# Altium PCB PCB1.PcbDoc (part 3 of 3)
Units mil, origin at the board's own origin, x right, y up, seen from the top; angles counter-clockwise.
Board outline 7110 x 5135 mil, 4 copper layers (Top Layer, Layer 1, Layer 2, Bottom Layer), stack 23.756 mil thick; 224 components, 137 nets, 658 pads, 306 vias.
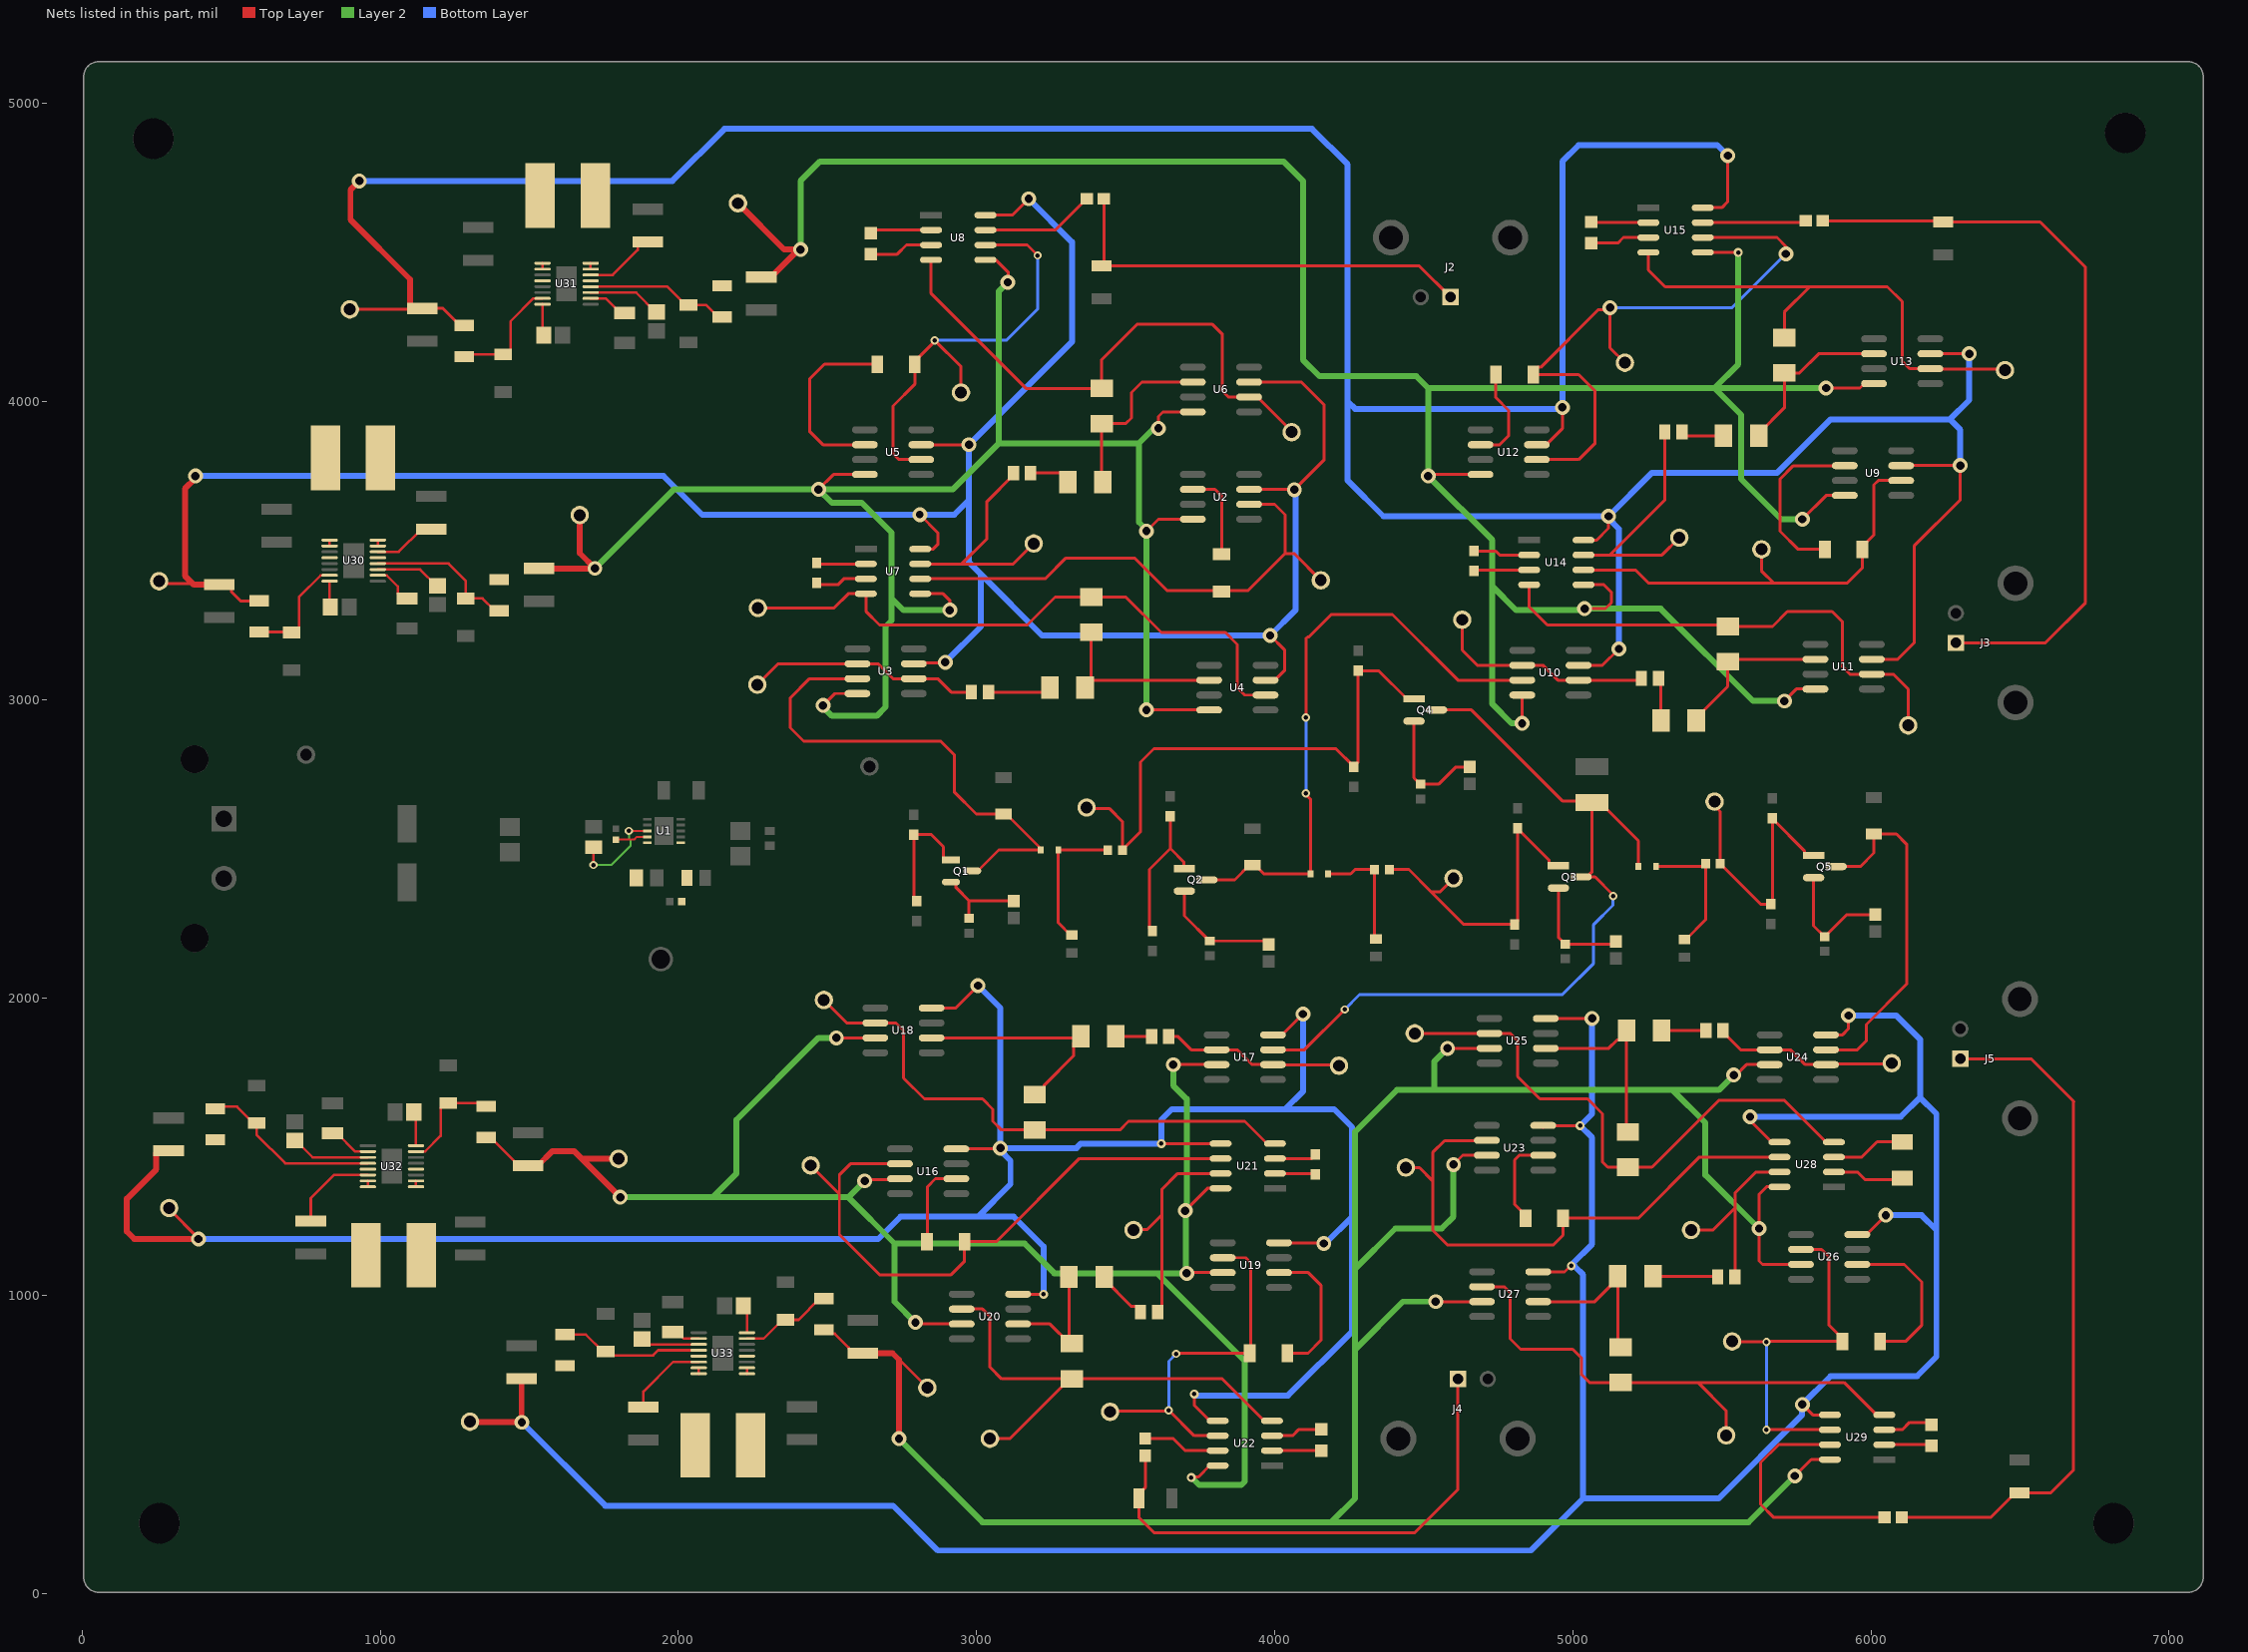
[diagram p4: the nets of this part, all layers, seen from the top]

## Via types
v1: diameter 28, hole 15, Top Layer to Bottom Layer, 195 vias
v2: diameter 50, hole 28, Top Layer to Bottom Layer, 70 vias
v3: diameter 19.68, hole 7.87, Top Layer to Bottom Layer, 24 vias
v4: diameter 30, hole 15, Top Layer to Bottom Layer, 16 vias
v5: diameter 50, hole 25, Top Layer to Bottom Layer, 1 vias

## Nets (pads, with @x,y where several pads share a name; then routed paths per layer and width w, separated by ;. In a path a pad name is that pad's centre, name@x,y a point inside that pad or via, vN(x,y) a via of type N, cw(c..) or ccw(c..) an arc to the next point about the centre after c; other vN are vias at no path point) (continued)
NetC5_1: C5.1 R16.2 R19.2 | length 456.8
  Top Layer w10: R16.2@5279.53,2440 5435.39,2440 C5.1@5445.32,2449.92 ; R19.2@5375,2194.53 5378.94,2194.53 5445.32,2260.91 C5.1@5445.32,2449.92 ; C5.1@5445.32,2450 C5.1@5445.32,2449.92
NetC5_2: C5.2 J8.1 Q5.1 R14.1 R26.2 | length 926.4
  Top Layer w10: J8.1@5475.55,2657.4 5475.55,2643.38 5494.68,2624.25 C5.2@5494.68,2450 5494.68,2448.94 5630.16,2313.46 R26.2@5665,2313.46 5670,2318.46 R14.1@5670,2599.57 ; R14.1@5670,2601.54 R14.1@5670,2599.57 ; Q5.1@5807.69,2477.09 5783.94,2477.09 5776.78,2484.25 5776.78,2492.79 R14.1@5670,2599.57
NetC6_1: C6.1 R17.2 R20.2 | length 472.4
  Top Layer w10: R20.2@3320,2209.53 3316.06,2209.53 3274.53,2251.06 R17.2@3274.53,2495 C6.1@3440.32,2495
NetC6_2: C6.2 J9.1 Q4.1 R13.1 R25.2 | length 1868.1
  Top Layer w10: J9.1@3369.25,2637.72 3371.97,2635 3445,2635 3489.68,2590.32 C6.2@3489.68,2496.06 ; C6.2@3489.68,2495 C6.2@3489.68,2496.06 ; R25.2@4265,2773.46 R25.2@4265,2775.43 ; Q4.1@4467.2,3002.4 4443.45,3002.4 4349.32,3096.54 R13.1@4280,3096.54 4280,2790.43 R25.2@4265,2775.43 ; C6.2@3489.68,2496.06 3550,2556.38 3550,2790 3595,2835 4205.43,2835 R25.2@4265,2775.43
NetC7_1: C7.1 R18.2 R21.2 | length 397.4
  Top Layer w10: R18.2@4179.53,2415 4255,2415 4270,2430 C7.1@4335.32,2430 4335.32,2201.22 R21.2@4340,2196.54
NetC7_2: C7.2 J10.1 Q3.1 R11.1 R24.2 | length 1112.5
  Top Layer w10: C7.2@4384.68,2430 4450,2430 4525,2355 ; J10.1@4600,2400 4555,2355 4525,2355 ; R11.1@4815,2568.54 R11.1@4815,2566.57 ; Q3.1@4952.2,2442.4 4928.45,2442.4 4921.29,2449.57 4921.29,2460.29 R11.1@4815,2566.57 ; 4525,2355 4634.53,2245.47 R24.2@4805,2245.47 4815,2255.47 R11.1@4815,2566.57
NetC8_1: C8.1 Q1.2 R27.2 | length 304.2
  Top Layer w10: Q1.2@2914.17,2387.6 2925.36,2387.6 2931.25,2381.71 2931.25,2368.75 2975,2325 ; C8.1@2975,2265.74 2975,2325 ; R27.2@3125,2323.57 3123.57,2325 2975,2325
NetC9_1: C9.1 Q2.2 R28.2 | length 405.7
  Top Layer w10: Q2.2@3697.2,2357.6 3697.2,2274.34 3781.58,2189.96 C9.1@3782.64,2189.96 3968.61,2189.96 R28.2@3980,2178.57
NetC10_1: C10.1 Q3.2 R29.2 | length 371.7
  Top Layer w10: Q3.2@4952.2,2367.6 4952.2,2201.42 4973.94,2179.68 C10.1@4975,2179.68 5136.12,2179.68 R29.2@5145,2188.57
NetC11_1: C11.1 Q4.2 R30.2 | length 410.5
  Top Layer w10: Q4.2@4467.2,2927.6 4467.2,2737.48 4488.94,2715.74 C11.1@4490,2715.74 4549.56,2715.74 4606.43,2772.61 R30.2@4655,2772.61
NetC12_1: C12.1 Q5.2 R31.2 | length 414.3
  Top Layer w10: Q5.2@5807.69,2402.28 5807.69,2240.93 5843.94,2204.68 C12.1@5845,2204.68 5846.06,2204.68 5919.95,2278.57 R31.2@6015,2278.57
NetC13_1: C13.1 J12.1 U3.2 U3.6 | length 786.1
  Top Layer w10: J12.1@2265,3050 2335,3120 U3.2@2600.51,3120 2670,3120 2720,3070 U3.6@2789.49,3070 2870,3070 2915,3025 C13.1@2982.74,3025
NetC13_2: C13.2 R33.1 | length 212.2
  Top Layer w10: C13.2@3040,3025 3230.94,3025 R33.1@3245.94,3040
NetC14_1: C14.1 J14.1 U7.7 | length 786.2
  Top Layer w10: U7.7@2811.18,3455 2950,3455 ; C14.1@3124.09,3759.76 3124.09,3753.77 3035,3664.69 3035,3540 2950,3455 ; J14.1@3192.09,3523.54 3123.54,3455 2950,3455
NetC14_2: C14.2 R36.1 | length 140
  Top Layer w10: C14.2@3181.35,3759.76 3281.42,3759.76 3305.94,3735.24 R36.1@3305.94,3730
NetC15_1: C15.1 J2.1 R37.2 | length 1441.4
  Top Layer w10: R37.2@3427.14,4680 3427.14,4462.26 C15.1@3420,4455.12 4484.88,4455.12 J2.1@4590,4350
NetC16_1: C16.1 J18.1 U10.2 U10.6 | length 747.2
  Top Layer w10: J18.1@4629.1,3267.64 4629.1,3165.91 4679.68,3115.32 4830.19,3115.32 U10.2@4830.51,3115 4900,3115 4950,3065 U10.6@5019.49,3065 5224.6,3065 C16.1@5230.39,3070.79
NetC16_2: C16.2 R42.1 | length 144.2
  Top Layer w10: C16.2@5287.65,3070.79 5295.94,3062.49 R42.1@5295.94,2930
NetC17_1: C17.1 J20.1 U14.7 | length 834.2
  Top Layer w10: U14.7@5036.18,3485 5125,3485 ; C17.1@5309.13,3897.56 5309.13,3669.13 5125,3485 ; J20.1@5357.44,3543.23 5299.21,3485 5125,3485
NetC17_2: C17.2 R45.1 | length 144.8
  Top Layer w10: C17.2@5366.39,3897.56 5378.94,3885 R45.1@5505.94,3885
NetC18_1: C18.1 J3.1 R46.2 | length 2561.9
  Top Layer w10: R46.2@5838.77,4606.22 6239.33,4606.22 C18.1@6243.27,4602.28 6567.72,4602.28 6720,4450 6720,3325 6585,3190 J3.1@6285,3190
NetC19_1: C19.1 J24.1 U17.2 U17.6 | length 611.6
  Top Layer w10: C19.1@3644.84,1870 3675,1870 3720,1825 U17.6@3805.51,1825 3875,1825 3925,1775 U17.2@3994.49,1775 3996.2,1773.29 4214,1773.29 J24.1@4215.71,1771.57
NetC19_2: C19.2 R51.1 | length 119.9
  Top Layer w10: R51.1@3467.68,1870 C19.2@3587.58,1870
NetC20_1: C20.1 J26.1 U21.7 | length 751.8
  Top Layer w10: J26.1@3526.73,1220.39 3527.86,1221.53 3572.64,1221.53 3621.11,1270 ; C20.1@3607.26,945 3621.11,958.85 3621.11,1270 ; U21.7@3818.82,1410 3675,1410 3621.11,1356.11 3621.11,1270
NetC20_2: C20.2 R54.1 | length 178.7
  Top Layer w10: R54.1@3428.31,1062.91 3428.31,1055.04 3518.5,964.85 3536.15,964.85 3550,950.99 C20.2@3550,945
NetC21_1: C21.1 J4.1 R55.2 | length 1738.6
  Top Layer w10: R55.2@3566.1,463.48 3566.1,356.1 3544.76,334.76 C21.1@3544.76,320 3544.76,255.24 3595,205 4470,205 4615,350 J4.1@4615,720.39
NetC22_1: C22.1 J30.1 U24.2 U24.6 | length 618.9
  Top Layer w10: C22.1@5504.18,1889.68 5504.18,1883.69 5562.87,1825 U24.6@5660.51,1825 5730,1825 5780,1775 U24.2@5849.49,1775 5851.99,1777.5 6067.5,1777.5 J30.1@6070,1780
NetC22_2: C22.2 R60.1 | length 148.5
  Top Layer w10: R60.1@5298.39,1889.68 C22.2@5446.92,1889.68
NetC23_1: C23.1 J32.1 U28.7 | length 639.6
  Top Layer w10: J32.1@5396.81,1220.39 5470.39,1220.39 5545,1295 ; C23.1@5543.55,1062.91 5545,1064.36 5545,1295 ; U28.7@5693.82,1415 5615,1415 5545,1345 5545,1295
NetC23_2: C23.2 R62.1 | length 218.1
  Top Layer w10: R62.1@5269.06,1065 5484.2,1065 C23.2@5486.29,1062.91
NetC24_1: C24.1 J5.1 R64.2 | length 2319.2
  Top Layer w10: R64.2@6103.55,255.83 6401.73,255.83 6484.41,338.5 C24.1@6499.17,338.5 6603.5,338.5 6680,415 6680,1650 6680.86,1650.86 6536.72,1795 J5.1@6300,1795
NetC25_1: C25.1 U30.6 | length 210.9
  Top Layer w8.5: U30.6@991.71,3495.53 1062.17,3495.53 1138.52,3571.88 C25.1@1171,3571.88
NetC27_1: C27.1 J35.1 R68.2 U2.7 U3.7 U4.7 U5.7 U6.7 U7.8 U8.8 U30.12 | length 8421.8
  Top Layer w10: J35.1@258,3397 265.56,3389.44 359.44,3389.44 ; C27.1@501.18,3376.42 501.18,3361.38 531.36,3331.21 R68.2@594,3331.21 ; U3.7@2789.49,3120 2791.99,3122.5 2892.5,3122.5 v2(2895,3125) ; v5(2810,3620) 2870,3560 2870,3520 2855,3505 U7.8@2811.18,3505 ; U5.7@2814.49,3855 v2(2975,3855) ; U8.8@3030,4625 3120,4625 v2(3175,4680) ; U6.7@3914.49,4065 4090,4065 4165,3990 4165,3802.97 v2(4066.32,3704.29) ; U2.7@3914.85,3704.64 v2@4065.96,3704.64 ; U4.7@3969.49,3065 4000.98,3065 4032.8,3096.81 4032.8,3167.2 v2(3985,3215)
  Top Layer w20: v2(380,3750) 380,3742.22 345,3707.22 345,3415 374.88,3385.12 492.48,3385.12 C27.1@501.18,3376.42 ; U2.7@3914.49,3705 U2.7@3914.85,3704.64 ; v2@4065.96,3704.64 v2(4066.32,3704.29)
  Bottom Layer w20: v2(380,3750) 1950,3750 2080,3620 v5(2810,3620) 2925,3620 2975,3670 ; v2(2895,3125) 3015,3245 3015,3420 ; v2(3175,4680) 3320,4535 3320,4200 v2(2975,3855) 2975,3670 ; v2(4066.32,3704.29) 4070,3700.6 4070,3300 v2(3985,3215) 3220,3215 3015,3420 ; 2975,3670 2975,3460 3015,3420
NetC28_1: C28.1 J36.1 R69.2 U2.4 U3.4 U4.4 U5.4 U6.4 U7.5 U8.5 U30.5 | length 6401.2
  Top Layer w10: v2(2470,3705) 2520,3755 U5.4@2625.51,3755 ; v2(2485,2980) 2525,3020 U3.4@2600.51,3020 ; U7.5@2811.18,3355 2888,3355 2910,3333 v2(2910,3300) ; U8.5@3030,4475 3032.17,4472.83 3067.17,4472.83 3105.86,4434.14 3105.86,4400.86 v2(3105,4400) ; v2(3570,2965) U4.4@3780.51,2965 ; v2(3570,3565) 3610,3605 U2.4@3725.51,3605 ; v2(3610,3910) 3610,3950 3625,3965 U6.4@3725.51,3965
  Top Layer w20: C28.1@1532,3440.12 1532.12,3440 v2(1720,3440) 1669,3491 J36.1@1669,3619
  Layer 2 w20: v2(1720,3440) 1985,3705 v2(2470,3705) ; v2(2485,2980) 2485,2975 2515,2945 2665,2945 2695,2975 2695,3245 2715,3265 2715,3340 ; v2(2910,3300) 2755,3300 2715,3340 ; v2(3105,4400) 3075,4370 3075,3860 ; v2(3570,2965) v2(3570,3565) 3570,3570 3545,3595 3545,3860 ; v2(3610,3910) 3595,3910 3545,3860 ; v2(2470,3705) 2515,3660 2615,3660 2715,3560 2715,3340 ; v2(2470,3705) 2920,3705 3075,3860 ; 3075,3860 3545,3860
NetC29_1: C29.1 U30.9 U30.10 | length 19.7
  Top Layer w8.5: U30.10@830.29,3515.21 U30.9@830.29,3534.9
NetC29_2: C29.2 U30.7 U30.8 | length 19.7
  Top Layer w8.5: U30.7@991.71,3515.21 U30.8@991.71,3534.9
NetC30_2: C30.2 U30.3 | length 223.1
  Top Layer w8.5: U30.3@991.71,3436.47 1134.07,3436.47 1189.05,3381.5 C30.2@1192,3381.5
NetC31_2: C31.2 U30.16 | length 87
  Top Layer w8.5: U30.16@830.29,3397.1 830.29,3313.21 C31.2@832.5,3311
NetC32_1: C32.1 U31.6 | length 245
  Top Layer w8.5: U31.6@1705.71,4424.53 1779.53,4424.53 1863.41,4508.41 1863.41,4520.43 1877.86,4534.88 C32.1@1898,4534.88
NetC34_1: C34.1 J37.1 R73.2 U9.7 U10.7 U11.7 U12.7 U13.7 U14.8 U15.8 U31.12 | length 12537.9
  Top Layer w10: J37.1@898,4309 C34.1@1108.52,4309 ; C34.1@1141,4312.12 1210.27,4312.12 1267.18,4255.21 R73.2@1281,4255.21 ; U12.7@4879.49,3855 4910.98,3855 4965,3909.02 v2(4965,3980) ; U10.7@5019.49,3115 5100,3115 v2(5155,3170) ; U14.8@5036.18,3535 5080,3535 5120,3575 v2(5120,3615) ; U15.8@5436.18,4650 5500,4650 5520,4670 v2(5520,4825) ; U11.7@6003.11,3135.16 6090.16,3135.16 6145,3190 6145,3515 6300,3670 v2(6300,3785) ; U9.7@6101.65,3784.88 v2@6299.88,3784.88 ; U13.7@6199.49,4160 v2(6330,4160)
  Top Layer w20: v2(930,4740) 900,4710 900,4610 1100,4410 1100,4320.64 1108.52,4312.12 C34.1@1141,4312.12 ; U9.7@6101.54,3784.76 U9.7@6101.65,3784.88 ; v2@6299.88,3784.88 v2(6300,3785)
  Bottom Layer w20: v2(930,4740) 1980,4740 2155,4915 4125,4915 4245,4795 4245,4000 ; v2(5155,3170) 5155,3572.22 5120,3607.22 v2(5120,3615) ; v2(5520,4825) 5485,4860 5020,4860 4965,4805 v2(4965,3980) 4960,3975 4270,3975 4245,4000 ; v2(6300,3785) 6300,3905 6265,3940 ; v2(6330,4160) 6330,4005 6265,3940 ; 4245,4000 4245,3735 4365,3615 v2(5120,3615) ; v2(5120,3615) 5265,3760 5685,3760 5865,3940 6265,3940
NetC35_1: C35.1 J38.1 R74.2 U9.4 U10.4 U11.4 U12.4 U13.4 U14.5 U15.5 U31.5 | length 9404.3
  Top Layer w10: v2@4520,3755 U12.4@4690.51,3755 ; v2(4830,2920) U10.4@4830,3014.49 ; U14.5@5036.18,3385 5105,3385 5130,3360 5130,3325 5110,3305 v2(5040,3305) ; U15.5@5436.18,4500 v4(5555,4500) ; v2(5710,2995) 5750.16,3035.16 U11.4@5814.13,3035.16 ; v2(5770,3605) 5849.76,3684.76 U9.4@5912.56,3684.76 ; v2(5850,4045) 5963.25,4045 5978.25,4060 U13.4@6010.51,4060
  Top Layer w20: J38.1@2200,4665 2355,4510 v2@2403.36,4510 ; C35.1@2278,4417.12 2310.48,4417.12 v2@2403.36,4510 ; v2(2410,4510) v2@2403.36,4510 ; v2(4515,3750) v2@4520,3755 ; U10.4@4830,3014.49 U10.4@4830.51,3015
  Layer 2 w20: v2(2410,4510) 2410,4740 2475,4805 4030,4805 4095,4740 4095,4140 4150,4085 4475,4085 4515,4045 ; v2(4830,2920) 4795,2920 4730,2985 4730,3380 ; v4(5555,4500) 5555,4125 5475,4045 ; v2(5710,2995) 5605,2995 5295,3305 v2(5040,3305) 5035,3300 4810,3300 4730,3380 ; v2(5770,3605) 5700,3605 5565,3740 5565,3955 5475,4045 ; v2(5850,4045) 5475,4045 ; 4515,4045 v2(4515,3750) 4730,3535 4730,3380 ; 4515,4045 5475,4045
NetC36_1: C36.1 U31.9 U31.10 | length 19.7
  Top Layer w8.5: U31.10@1544.29,4444.21 U31.9@1544.29,4463.9
NetC36_2: C36.2 U31.7 U31.8 | length 19.7
  Top Layer w8.5: U31.7@1705.71,4444.21 U31.8@1705.71,4463.9
NetC37_2: C37.2 U31.3 | length 248.4
  Top Layer w8.5: U31.3@1705.71,4365.47 1858.57,4365.47 1924.05,4299.99 C37.2@1927,4299.99
NetC38_2: C38.2 U31.16 | length 104.8
  Top Layer w8.5: U31.16@1544.29,4326.1 1544.29,4227.21 C38.2@1548.5,4223
NetC39_1: C39.1 U32.6 | length 300.6
  Top Layer w8.5: C39.1@767,1250.12 767,1327 844.68,1404.68 U32.6@958.58,1404.68
NetC41_1: C41.1 J39.1 R78.2 U16.7 U17.7 U18.7 U19.7 U20.7 U21.8 U22.8 U32.12 | length 6487
  Top Layer w8.5: R78.2@1355,1530.79 1368.82,1530.79 1449.07,1450.55 1449.07,1450.33 1463.52,1435.88 C41.1@1496,1435.88
  Top Layer w10: v2(2530,1865) U18.7@2660.51,1865 ; v2(2625,1385) 2629.64,1389.64 2740.66,1389.64 U16.7@2743.27,1392.24 ; v2@2799.31,905.69 U20.7@2949.82,905.69 ; v2(3660,1775) U17.7@3805.51,1775 ; v2(3700,1285) 3775,1360 U21.8@3818.82,1360 ; v2@3707.36,1077.36 U19.7@3825.87,1077.36 ; v4(3720,390) 3721.91,391.91 3744.51,391.91 3782.6,430 U22.8@3808.82,430
  Top Layer w20: C41.1@1496,1435.88 1528.48,1435.88 1577.6,1485 1650,1485 1676,1459 ; J39.1@1799,1459 1676,1459 ; v2(1805,1330) 1676,1459 ; v2(2795,910) v2@2799.31,905.69 ; U20.7@2949.82,905.69 U20.7@2950.51,905 ; v2(3705,1075) v2@3707.36,1077.36 ; U19.7@3825.87,1077.36 U19.7@3825.94,1077.28
  Layer 2 w20: v2(1805,1330) 2115,1330 ; v2(2530,1865) 2470,1865 2195,1590 2195,1410 2115,1330 ; v2(2625,1385) 2570,1330 ; v2(2795,910) 2725,980 2725,1175 ; v2(3660,1775) 3660,1705 3705,1660 3705,1290 v2(3700,1285) 3702.5,1282.5 3702.5,1077.5 v2(3705,1075) 3605,1075 ; v4(3720,390) 3721.72,390 3746.72,365 3888.28,365 3900,376.72 3900,780 3605,1075 ; 2115,1330 2570,1330 ; 2570,1330 2725,1175 ; 2725,1175 3160.94,1175 3260.94,1075 3605,1075
NetC42_1: C42.1 J40.1 R79.2 U16.4 U17.4 U18.4 U19.4 U20.4 U21.5 U22.5 U32.5 | length 8803.1
  Top Layer w10: J40.1@292,1291 v2@390,1193 ; U18.4@2849.49,1965 2930,1965 v2(3005,2040) ; U16.4@2932.24,1492.24 v2@3077.24,1492.24 ; U20.4@3139.49,1005 v4(3225,1005) ; v4(3620,1510) U21.5@3818.82,1510 ; v4(3730,670) 3730,632.6 3782.6,580 U22.5@3808.82,580 ; U17.4@3994.49,1875 4025.49,1875 4095,1944.51 v2(4095,1945) ; U19.4@4014.92,1177.28 4162.72,1177.28 v2(4165,1175)
  Top Layer w20: C42.1@290,1485.88 257.52,1485.88 248.82,1477.18 248.82,1423.82 150,1325 150,1215 175,1190 v2(390,1190) v2@390,1193 ; J40.1@292,1291 J40.1@292,1294 ; v2@3077.24,1492.24 v2(3080,1495)
  Bottom Layer w20: v2(390,1190) 2670,1190 2745,1265 3005,1265 ; v2(3005,2040) 3080,1965 v2(3080,1495) ; v4(3225,1005) 3225,1165 3125,1265 3005,1265 ; v4(3730,670) 3735,665 4045,665 4260,880 4260,1265 ; v2(4095,1945) 4095,1685 4035,1625 ; v2(4165,1175) 4170,1175 4260,1265 ; 3005,1265 3114,1374 3114,1452.88 3080,1486.88 v2(3080,1495) ; v2(3080,1495) 3335,1495 3350,1510 v4(3620,1510) 3620,1590 3655,1625 4035,1625 ; 4035,1625 4200,1625 4260,1565 4260,1265
NetC43_1: C43.1 U32.9 U32.10 | length 19.7
  Top Layer w8.5: U32.9@1120,1365.31 U32.10@1120,1385
NetC43_2: C43.2 U32.7 U32.8 | length 19.7
  Top Layer w8.5: U32.8@958.58,1365.31 U32.7@958.58,1385
NetC44_2: C44.2 U32.3 | length 268.1
  Top Layer w8.5: C44.2@714,1520.5 716.95,1520.5 773.72,1463.74 U32.3@958.58,1463.74
NetC45_2: C45.2 U32.16 | length 115.8
  Top Layer w8.5: C45.2@1113,1616 1120,1609 U32.16@1120,1503.11
NetC46_1: C46.1 U33.6 | length 278.5
  Top Layer w8.5: C46.1@1883,626 1883,678 1982.47,777.47 U33.6@2068.29,777.47
NetC48_1: C48.1 J42.1 R83.2 U23.7 U24.7 U25.7 U26.7 U27.7 U28.8 U29.8 U33.12 | length 9373.8
  Top Layer w8.5: R83.2@2488,885.79 2501.61,872.18 2524.82,872.18 2571.07,825.93 2571.07,821.33 2603.55,821.33 C48.1@2618,806.88 ; 2740,785 2741,785 J42.1@2835,691
  Top Layer w10: v2(4540,980) U27.7@4695.51,980 ; v2(4580,1830) U25.7@4720.51,1830 ; v2(4600,1440) 4630.98,1470.98 U23.7@4711.77,1470.98 ; v2(5540,1740) 5547.78,1740 5582.78,1775 U24.7@5660.51,1775 ; U28.8@5693.82,1365 5650,1365 5625,1340 v2(5625,1225) 5625,1116.62 5636.72,1104.9 U26.7@5765.41,1104.9 ; v2(5745,395) 5800,450 U29.8@5862.63,450
  Top Layer w20: C48.1@2618,806.88 2718.12,806.88 2740,785 v2(2740,520)
  Layer 2 w20: v2(2740,520) 3020,240 4190,240 ; v2(4540,980) 4430,980 4270,820 ; v2(4580,1830) 4535,1785 4535,1690 ; v2(4600,1440) 4600,1265 4560,1225 4405,1225 4270,1090 ; v2(5540,1740) 5490,1690 5335,1690 ; v2(5625,1225) 5445,1405 5445,1580 5335,1690 ; v2(5745,395) 5590,240 4190,240 ; 4190,240 4270,320 4270,820 ; 4270,820 4270,1090 ; 4270,1090 4270,1550 4410,1690 4535,1690 ; 4535,1690 5335,1690
NetC49_1: C49.1 J41.1 R84.2 U23.4 U24.4 U25.4 U26.4 U27.4 U28.5 U29.5 U33.5 | length 10267.6
  Top Layer w10: U27.4@4884.49,1080 4972.57,1080 4992.57,1100 v4(4995,1100) ; U23.4@4901.24,1570.49 v4@5024.51,1570.49 ; U25.4@4909.49,1930 v2(5065,1930) ; v2(5595,1600) 5600.74,1594.26 5600.74,1581.86 5667.6,1515 U28.5@5693.82,1515 ; v2(5770,635) 5805,600 U29.5@5862.63,600 ; U24.4@5849.49,1875 5905,1875 5925,1895 v2(5925,1940) ; U26.4@5954.49,1205 5985.49,1205 6050,1269.51 v2(6050,1270)
  Top Layer w20: J41.1@1301,577 1302,576 v2@1474,576 ; C49.1@1474,721.76 v2@1474,576 ; v2(1475,575) v2@1474,576 ; U23.4@4900.75,1570.98 U23.4@4901.24,1570.49 ; v4@5024.51,1570.49 v4(5025,1570)
  Bottom Layer w20: v2(1475,575) 1755,295 2720,295 2870,145 4860,145 5035,320 ; v4(4995,1100) 4996.91,1098.09 5006.91,1098.09 5035,1070 5035,320 ; v4@4998.65,1106.35 5065,1172.71 5065,1530 v4(5025,1570) 5065,1610 v2(5065,1930) ; v2(5595,1600) 6100,1600 6165,1665 ; v2(5925,1940) 6085,1940 6165,1860 6165,1665 ; v2(6050,1270) 6170,1270 6220,1220 ; 5035,320 5490,320 5768.61,598.61 5768.61,633.61 5865,730 6155,730 6220,795 6220,1220 ; 6165,1665 6220,1610 6220,1220
NetC50_1: C50.1 U33.9 U33.10 | length 19.7
  Top Layer w8.5: U33.9@2229.71,738.1 U33.10@2229.71,757.79
NetC50_2: C50.2 U33.7 U33.8 | length 19.7
  Top Layer w8.5: U33.8@2068.29,738.1 U33.7@2068.29,757.79
NetC51_2: C51.2 U33.3 | length 197.7
  Top Layer w8.5: C51.2@1878,854.5 1895.97,836.53 U33.3@2068.29,836.53
NetC52_2: C52.2 U33.16 | length 95
  Top Layer w8.5: C52.2@2218,966 2229.71,954.29 U33.16@2229.71,875.9
NetJ11_1: J11.1 R32.2 U4.6 U7.4 | length 2060.6
  Top Layer w10: J11.1@2266.89,3307.01 2522.01,3307.01 2570,3355 U7.4@2628.82,3355 2628.82,3296.18 2675,3250 3170,3250 3264.06,3344.06 R32.2@3385,3344.06 3500.94,3344.06 3620,3225 3835,3225 3875,3185 3875,3040 3900,3015 U4.6@3969.49,3015
NetJ13_1: J13.1 R34.2 U6.6 U8.4 | length 1863.2
  Top Layer w10: U8.4@2847.63,4475 2847.63,4362.37 3165.94,4044.06 R34.2@3420,4044.06 3420,4140 3540,4260 3790,4260 3825,4225 3825,4035 3845,4015 U6.6@3914.49,4015 3942.49,4015 4057,3900.49 J13.1@4057,3897
NetJ15_1: J15.1 R39.2 U2.6 U7.6 | length 1772.4
  Top Layer w10: U7.6@2811.18,3405 3230,3405 3300,3475 3530,3475 3640,3365 3910,3365 4035,3490 ; U2.6@3914.49,3655 4000,3655 4035,3620 4035,3490 ; J15.1@4155,3400 4065,3490 4035,3490
NetJ16_1: J16.1 R40.2 U5.6 U8.6 | length 1510.2
  Top Layer w10: U5.6@2814.49,3805 2740,3805 2720,3825 2720,3985 2792.99,4057.99 R40.2@2792.99,4125 2792.99,4134.84 2860,4201.85 v1(2860,4205) 2948,4117 J16.1@2948,4030 ; U8.6@3030,4525 3170,4525 v1(3205,4490)
  Bottom Layer w10: v1(2860,4205) 3100,4205 3205,4310 v1(3205,4490)
NetJ17_1: J17.1 R41.2 U11.6 U14.4 | length 1710.4
  Top Layer w10: U14.4@4853.82,3385 4853.82,3311.18 4915,3250 5515,3250 R41.2@5520,3245 5670,3245 5720,3295 5870,3295 5905,3260 5905,3110 5929.84,3085.16 U11.6@6003.11,3085.16 6074.84,3085.16 6125.16,3034.84 J17.1@6125.16,2913.31
NetJ19_1: J19.1 R43.2 U13.6 U15.4 | length 1717.6
  Top Layer w10: U15.4@5253.82,4500 5253.82,4441.18 5310,4385 5795,4385 ; R43.2@5710,4214.06 5710,4300 5795,4385 ; U13.6@6199.49,4110 6130,4110 6105,4135 6105,4335 6055,4385 5795,4385 ; U13.6@6200.18,4109.31 J19.1@6445.69,4109.31
  Top Layer w20: U13.6@6199.49,4110 U13.6@6200.18,4109.31 ; J19.1@6445.69,4109.31 J19.1@6450,4105
NetJ21_1: J21.1 R49.2 U12.6 U15.6 | length 2165.6
  Top Layer w10: U12.6@4879.49,3805 5020,3805 5075,3860 5075,4035 5020,4090 R49.2@4867.99,4090 4867.99,4099.84 4882.68,4114.53 4892.52,4114.53 5085.34,4307.35 5117.35,4307.35 v2(5125,4315) 5125,4180 J21.1@5175,4130 ; U15.6@5436.18,4550 5685,4550 5715,4520 v2(5715,4495)
  Bottom Layer w10: v2(5125,4315) 5535,4315 v2(5715,4495)
NetJ22_1: J22.1 R48.2 U9.6 U14.6 | length 1498.6
  Top Layer w10: U14.6@5036.18,3435 5210,3435 5255,3390 5675,3390 ; J22.1@5633.03,3503.86 5633.03,3431.97 5675,3390 ; U9.6@6101.54,3734.76 6024.76,3734.76 6010,3720 6010,3552.09 5971.61,3513.7 R48.2@5971.61,3503.86 5971.61,3441.61 5920,3390 5675,3390
NetJ23_1: J23.1 R50.2 U18.6 U21.4 | length 1854.1
  Top Layer w10: J23.1@2488,1992 2565,1915 U18.6@2660.51,1915 2730,1915 2755,1890 2755,1730 2825,1660 3020,1660 3055,1625 3055,1585 3084.06,1555.94 R50.2@3195,1555.94 3480.94,1555.94 3510,1585 3899.96,1585 3974.96,1510 U21.4@4001.18,1510
NetJ25_1: J25.1 R52.2 U20.6 U22.4 | length 1645.9
  Top Layer w10: U20.6@2950.51,955 3020,955 3045,930 3045,760 3084.06,720.94 R52.2@3312.13,720.94 ; J25.1@3045,520 3111.18,520 R52.2@3312.13,720.94 ; U22.4@3991.18,580 3964.96,580 3824.02,720.94 R52.2@3320,720.94 R52.2@3312.13,720.94
NetJ27_1: J27.1 R58.2 U19.6 U22.6 | length 1251.4
  Top Layer w10: J27.1@3447.99,610.16 3450.41,612.58 3642.58,612.58 v1(3645,615) 3730,530 U22.6@3808.82,530 ; v1(3670,805) 3672.01,807.01 R58.2@3916.5,807.01 3920,810.51 3920,1110 3902.72,1127.28 U19.6@3825.94,1127.28
  Bottom Layer w10: v1(3645,615) 3645,780 v1(3670,805)
NetJ28_1: J28.1 R57.2 U16.6 U21.6 | length 2089.2
  Top Layer w10: J28.1@2444.05,1436.93 2540,1340.98 ; U16.6@2743.27,1442.24 2577.24,1442.24 2540,1405 2540,1340.98 ; U21.6@3818.82,1460 3345,1460 3066.02,1181.02 R57.2@2959.8,1181.02 2959.8,1115.2 2914.61,1070 2675,1070 2540,1205 2540,1340.98
NetJ29_1: J29.1 R59.2 U25.6 U28.4 | length 1908
  Top Layer w10: J29.1@4470,1880 U25.6@4720.51,1880 4790,1880 4815,1855 4815,1735 4890,1660 5050,1660 5100,1610 5100,1448.28 5117.34,1430.94 R59.2@5185,1430.94 5265.94,1430.94 5490,1655 5709.96,1655 5849.96,1515 U28.4@5876.18,1515
NetJ31_1: J31.1 R61.2 U27.6 U29.4 | length 1867.1
  Top Layer w10: U27.6@4695.51,1030 4770,1030 4790,1010 4790,855 4825,820 5000,820 5030,790 5030,735 5056.42,708.58 R61.2@5160.59,708.58 5420,708.58 ; J31.1@5514.92,531.42 5514.92,613.66 5420,708.58 ; U29.4@6045,600 6018.78,600 5910.2,708.58 5420,708.58
NetJ33_1: J33.1 R67.2 U26.6 U29.6 | length 1285.8
  Top Layer w10: J33.1@5534.61,846.38 5535.3,845.69 5649.31,845.69 v1(5650,845) 5651.38,846.38 R67.2@5904.68,846.38 5904.68,856.22 5860,900.91 5860,1130 5835,1155 U26.6@5765.51,1155 ; v1(5650,550) U29.6@5862.63,550
  Bottom Layer w10: v1(5650,550) v1(5650,845)
NetJ34_1: J34.1 R66.2 U23.6 U28.6 | length 1907.5
  Top Layer w10: J34.1@4440,1430 4440.91,1429.09 4485.91,1429.09 4530,1385 ; U23.6@4711.77,1520.98 4710.79,1520 4570,1520 4530,1480 4530,1385 ; U28.6@5693.82,1465 5424.98,1465 5219.74,1259.76 R66.2@4967.68,1259.76 4967.68,1202.68 4935,1170 4580,1170 4530,1220 4530,1385
NetQ1_1: Q1.1 R7.1 R22.2 | length 407.9
  Top Layer w10: R22.2@2800,2323.46 2790,2333.46 R7.1@2790,2546.54 2848.46,2546.54 2889.16,2505.84 2889.16,2468.78 2895.54,2462.4 Q1.1@2914.17,2462.4
NetQ1_3: Q1.3 R8.1 R17.1 U3.3 | length 1697.7
  Top Layer w10: U3.3@2600.51,3070 2440,3070 2375,3005 2375,2905 2420,2860 2880,2860 2925,2815 2925,2690 2999.01,2615.99 R8.1@3090,2615.99 3099.84,2615.99 3210.63,2505.2 3210.63,2499.84 R17.1@3215.47,2495 3074.46,2495 3004.46,2425 Q1.3@2985.83,2425
NetQ2_1: Q2.1 R9.1 R23.2 | length 505.4
  Top Layer w10: R23.2@3590,2223.46 3580,2233.46 3580,2430 3650,2500 ; R9.1@3650,2608.54 3650,2500 ; Q2.1@3697.2,2432.4 3696.29,2433.31 3696.29,2453.71 3650,2500
NetQ2_3: Q2.3 R10.1 R18.1 U10.3 | length 2025.6
  Top Layer w10: Q2.3@3772.8,2395 3866.18,2395 3915.16,2443.98 R10.1@3925,2443.98 3934.84,2443.98 3963.82,2415 R18.1@4120.47,2415 4120.47,2665.47 4105,2680.94 v1(4105,2685) ; v1(4105,2940) 4105,3204.14 4110.86,3210 4115,3210 4190,3285 4395,3285 4615,3065 U10.3@4830.51,3065
  Bottom Layer w10: v1(4105,2685) v1(4105,2940)
NetQ3_3: Q3.3 Q4.3 R12.1 R16.1 U17.3 | length 2787.3
  Top Layer w10: U17.3@3994.49,1825 4100,1825 v1(4235,1960) ; Q4.3@4542.8,2965 4660,2965 4965,2660 5059.96,2660 R12.1@5065,2654.96 ; Q3.3@5027.8,2405 Q3.3@5047.67,2405 ; v1(5135,2340) 5135,2345 5075,2405 Q3.3@5047.67,2405 ; R16.1@5220.47,2440 5220.47,2526.06 5091.57,2654.96 R12.1@5065,2654.96 ; Q3.3@5047.67,2405 5065,2422.33 R12.1@5065,2654.96
  Bottom Layer w10: v1(4235,1960) 4285,2010 4965,2010 5070,2115 5070,2245 5135,2310 v1(5135,2340)
NetQ5_3: Q5.3 R15.1 U24.3 | length 1197.4
  Top Layer w10: U24.3@5849.49,1825 5955,1825 5985,1855 5985,1910 6120,2045 6120,2515 6086.02,2548.98 R15.1@6010,2548.98 6010,2485 5964.69,2439.68 Q5.3@5883.29,2439.68
NetR1_1: R1.1 U1.4 | length 109.6
  Top Layer w7: R1.1@1790,2530.28 1851.28,2530.28 1860.29,2539.29 U1.4@1895.83,2539.29
NetR2_1: R2.1 U1.3 | length 325.6
  Top Layer w7: v1(1715,2445) 1715,2504.13 R2.1@1715.71,2504.84 ; v1(1834,2559) U1.3@1895.83,2558.98
  Layer 2 w7: v1(1715,2445) 1775,2445 1840.26,2510.26 1840.26,2528.66 1834,2534.91 v1(1834,2559)
NetR3_1: R3.1 R5.2 U1.6
NetR4_2: R4.2 U1.5
NetR32_1: R32.1 R33.2 U4.2 | length 591.6
  Top Layer w10: R33.2@3364.06,3040 3364.06,3040.47 R33.2@3385,3061.42 ; R32.1@3385,3225.94 R33.2@3385,3061.42 ; U4.2@3780.51,3065 3388.58,3065 R33.2@3385,3061.42
NetR34_1: R34.1 R36.2 U6.2 | length 610.5
  Top Layer w10: R36.2@3424.06,3730 3420,3734.06 R34.1@3420,3925.94 3500.94,3925.94 3520,3945 3520,4030 3555,4065 U6.2@3725.51,4065
NetR35_1: R35.1 U7.3 | length 176.1
  Top Layer w10: R35.1@2463.74,3391.65 2470.39,3385 2535,3385 2555,3405 U7.3@2628.82,3405
NetR35_2: R35.2 U7.2 | length 166.6
  Top Layer w10: R35.2@2463.74,3458.58 2467.32,3455 U7.2@2628.82,3455
NetR37_1: R37.1 U8.7 | length 383.5
  Top Layer w10: U8.7@3030,4575 3264.04,4575 3369.04,4680 R37.1@3370,4680
NetR38_1: R38.1 U8.3 | length 215.4
  Top Layer w10: R38.1@2645,4494.09 2734.09,4494.09 2765,4525 U8.3@2847.63,4525
NetR38_2: R38.2 U8.2 | length 206.8
  Top Layer w10: R38.2@2645,4565 2655,4575 U8.2@2847.63,4575
NetR39_1: R39.1 U2.2 | length 300.5
  Top Layer w10: U2.2@3725.51,3705 3800,3705 3822.01,3682.99 R39.1@3822.01,3488.11
NetR40_1: R40.1 U5.2 | length 626.9
  Top Layer w10: U5.2@2625.51,3855 2485,3855 2440,3900 2440,4075 2490,4125 R40.1@2667.01,4125
NetR41_1: R41.1 R42.2 U11.2 | length 538.3
  Top Layer w10: R42.2@5414.06,2930 5414.06,2937.87 5520,3043.82 R41.1@5520,3126.89 5528.27,3135.16 U11.2@5814.13,3135.16
NetR43_1: R43.1 R45.2 U13.2 | length 573.6
  Top Layer w10: R45.2@5624.06,3885 5624.06,3892.87 5710,3978.82 R43.1@5710,4095.94 5760.94,4095.94 5825,4160 U13.2@6010.51,4160
NetR44_1: R44.1 U14.3 | length 187
  Top Layer w10: R44.1@4668.47,3431.02 4672.44,3435 U14.3@4853.82,3435
NetR44_2: R44.2 U14.2 | length 190.7
  Top Layer w10: R44.2@4668.47,3497.95 4742.05,3497.95 4755,3485 U14.2@4853.82,3485
NetR46_1: R46.1 U15.7 | length 348
  Top Layer w10: U15.7@5436.18,4600 5775.41,4600 R46.1@5781.63,4606.22
NetR47_1: R47.1 U15.3 | length 199.4
  Top Layer w10: R47.1@5062.16,4531.4 5151.4,4531.4 5170,4550 U15.3@5253.82,4550
NetR47_2: R47.2 U15.2 | length 192.6
  Top Layer w10: R47.2@5062.16,4602.3 5064.47,4600 U15.2@5253.82,4600
NetR48_1: R48.1 U9.2 | length 587.1
  Top Layer w10: R48.1@5845.63,3503.86 5756.14,3503.86 5695,3565 5695,3740 5739.76,3784.76 U9.2@5912.56,3784.76
NetR49_1: R49.1 U12.2 | length 329.7
  Top Layer w10: U12.2@4690.51,3855 4755,3855 4785,3885 4785,3970 4742.01,4012.99 R49.1@4742.01,4090
NetR50_1: R50.1 R51.2 U18.2 | length 759.7
  Top Layer w10: U18.2@2849.49,1865 R51.2@3344.57,1865 ; R50.1@3195,1674.06 3202.87,1674.06 3227.4,1698.58 3227.4,1706.46 3325.04,1804.09 3325.04,1845.47 R51.2@3344.57,1865 ; R51.2@3349.57,1870 R51.2@3344.57,1865
NetR52_1: R52.1 R54.2 U20.2 | length 435.7
  Top Layer w10: U20.2@3139.49,905 3246.18,905 3312.13,839.06 R52.1@3320,839.06 3310.2,848.86 R54.2@3310.2,1062.91
NetR53_1: R53.1 U21.3 | length 142.9
  Top Layer w10: U21.3@4001.18,1460 4124.61,1460 4136.97,1472.36 R53.1@4136.97,1474.33
NetR53_2: R53.2 U21.2 | length 136.9
  Top Layer w10: U21.2@4001.18,1410 4134.37,1410 R53.2@4136.97,1407.4
NetR55_1: R55.1 U22.7 | length 259.5
  Top Layer w10: R55.1@3566.1,520.62 3659.91,520.62 3700.53,480 U22.7@3808.82,480
NetR56_1: R56.1 U22.3 | length 174.2
  Top Layer w10: U22.3@3991.18,530 4060,530 4080,550 4155.55,550 R56.1@4156.65,551.1
NetR56_2: R56.2 U22.2 | length 165.6
  Top Layer w10: U22.2@3991.18,480 4156.46,480 R56.2@4156.65,480.19
NetR57_1: R57.1 U16.2 | length 293
  Top Layer w10: R57.1@2833.82,1181.02 2835,1182.21 2835,1365 2862.24,1392.24 U16.2@2932.24,1392.24
NetR58_1: R58.1 U19.2 | length 472.9
  Top Layer w10: U19.2@4014.92,1077.28 4112.72,1077.28 4155,1035 4155,850 4112.01,807.01 R58.1@4042.48,807.01
NetR59_1: R59.1 R60.2 U25.2 | length 634.8
  Top Layer w10: U25.2@4909.49,1830 5120.59,1830 5147.87,1857.28 5155.75,1857.28 R60.2@5180.27,1881.81 ; R60.2@5180.27,1889.68 R60.2@5180.27,1881.81 ; R59.1@5185,1549.06 5180.27,1553.78 R60.2@5180.27,1881.81
NetR61_1: R61.1 R62.2 U27.2 | length 540.7
  Top Layer w10: U27.2@4884.49,980 5073.82,980 R62.2@5150.94,1057.13 ; R62.2@5150.94,1065 R62.2@5150.94,1057.13 ; R61.1@5160.59,826.69 5150.94,836.34 R62.2@5150.94,1057.13
NetR63_1: R63.1 U28.3 | length 250
  Top Layer w10: U28.3@5876.18,1465 5970,1465 6021.02,1516.02 R63.1@6105,1516.02
NetR63_2: R63.2 U28.2 | length 240.8
  Top Layer w10: U28.2@5876.18,1415 5955,1415 5980,1390 6101.02,1390 R63.2@6105,1393.98
NetR64_1: R64.1 U29.7 | length 832.2
  Top Layer w10: U29.7@5862.63,500 5690,500 5630,440 5630,300 5674.17,255.83 R64.1@6046.42,255.83
NetR65_1: R65.1 U29.3 | length 172.6
  Top Layer w10: U29.3@6045,550 6105,550 6130,575 6195.77,575 R65.1@6203.9,566.87
NetR65_2: R65.2 U29.2 | length 160.6
  Top Layer w10: U29.2@6045,500 6199.86,500 R65.2@6203.9,495.96
NetR66_1: R66.1 U23.2 | length 312.8
  Top Layer w10: R66.1@4841.69,1259.76 4841.69,1269.61 4805,1306.3 4805,1455 4820.98,1470.98 U23.2@4900.75,1470.98
NetR67_1: R67.1 U26.2 | length 548.6
  Top Layer w10: U26.2@5954.49,1105 6111.72,1105 6170.86,1045.86 6170,1045 6170,900 6116.38,846.38 R67.1@6030.67,846.38
NetR68_1: R68.1 R71.1 U30.15 | length 377.1
  Top Layer w8.5: R71.1@702,3224.99 711.84,3224.99 727.28,3240.43 727.28,3343.84 799.97,3416.53 830.03,3416.53 U30.15@830.29,3416.79
  Top Layer w10: R68.1@594,3226.79 700.2,3226.79 R71.1@702,3224.99
NetR69_1: R69.1 R70.1 U30.4 | length 506.5
  Top Layer w8.5: U30.4@991.71,3456.16 1228.84,3456.16 1287,3398 R70.1@1287,3338.99 1342.98,3338.99 1384.18,3297.79 R69.1@1398,3297.79
NetR72_2: R72.2 U30.2 | length 144.8
  Top Layer w8.5: U30.2@991.71,3416.79 991.97,3416.53 1022.03,3416.53 1058.82,3379.74 1058.82,3355.42 1075.24,3339 R72.2@1090,3339
NetR73_1: R73.1 R76.1 U31.15 | length 400
  Top Layer w8.5: R73.1@1281,4150.79 1288.2,4157.99 R76.1@1412,4157.99 1421.84,4157.99 1437.28,4173.43 1437.28,4268.84 1513.97,4345.53 1544.03,4345.53 U31.15@1544.29,4345.79
NetR74_1: R74.1 R75.1 U31.4 | length 483.3
  Top Layer w8.5: U31.4@1705.71,4385.16 1962.99,4385.16 2024.16,4323.99 R75.1@2034,4323.99 2092.98,4323.99 2133.18,4283.79 R74.1@2147,4283.79
NetR77_2: R77.2 U31.2 | length 134.4
  Top Layer w8.5: U31.2@1705.71,4345.79 1756.65,4345.79 1805.24,4297.2 R77.2@1820,4297.2
NetR78_1: R78.1 R81.1 U32.15 | length 362.2
  Top Layer w8.5: U32.15@1120,1483.42 1120.26,1483.68 1150.32,1483.68 1202.72,1536.08 1202.72,1630.57 1218.16,1646.01 R81.1@1228,1646.01 1344.2,1646.01 R78.1@1355,1635.21
NetR79_1: R79.1 R80.1 U32.4 | length 617.1
  Top Layer w8.5: R79.1@446,1627.21 452.96,1634.17 520,1634.17 575.16,1579.01 R80.1@585,1579.01 585,1540 680.95,1444.05 U32.4@958.58,1444.05
NetR82_2: R82.2 U32.2 | length 144
  Top Layer w8.5: R82.2@840,1544.8 854.76,1544.8 916.14,1483.42 U32.2@958.58,1483.42
NetR83_1: R83.1 R86.1 U33.15 | length 313.8
  Top Layer w8.5: U33.15@2229.71,856.21 2286.36,856.21 2349.16,919.01 R86.1@2359,919.01 2402.98,919.01 2474.18,990.21 R83.1@2488,990.21
NetR84_1: R84.1 R85.1 U33.4 | length 484.9
  Top Layer w8.5: R84.1@1619,869.21 1689.96,869.21 1746.16,813.01 R85.1@1756,813.01 1769.01,800 1915,800 1931.84,816.84 U33.4@2068.29,816.84
NetR87_2: R87.2 U33.2 | length 96.2
  Top Layer w8.5: R87.2@1981,877.8 1995.76,877.8 2017.35,856.21 U33.2@2068.29,856.21
pads on no net: J1. J2.3 J2.4 J3.3 J3.4 J4.3 J4.4 J5.3 J5.4 MP1. MP2. MP3. MP4. U2.1 U2.5 U2.8 U3.1 U3.5 U3.8 U4.1 U4.5 U4.8 U5.1 U5.5 U5.8 U6.1 U6.5 U6.8 U9.1 U9.5 U9.8 U10.1 U10.5 U10.8 U11.1 U11.5 U11.8 U12.1 U12.5 U12.8 U13.1 U13.5 U13.8 U16.1 U16.5 U16.8 U17.1 U17.5 U17.8 U18.1 U18.5 U18.8 U19.1 U19.5 U19.8 U20.1 U20.5 U20.8 U23.1 U23.5 U23.8 U24.1 U24.5 U24.8 U25.1 U25.5 U25.8 U26.1 U26.5 U26.8 U27.1 U27.5 U27.8

## Polygon pours and split planes (outlines as drawn)
GND on Top Layer "GND_L01_P006" (solid, pour order 6): 1920,2605 1920,2305 1890,2275 1655,2275 1535,2395 1535,2515 1370,2515 1305,2450 1010,2450 970,2410 970,2280 1040,2210 1950,2210 1985,2245 1985,2605
NetC3_1 on Top Layer "NETC3_1_L01_P010" (solid, pour order 10): 2010,2720 2095,2720 2095,2610 2043.98,2558.98 2008.03,2558.98 2008.03,2718.03
GND on Top Layer "GND_L01_P036" (solid, pour order 36): 1915,550 1915,335 1985,265 2355,265 2385,295 2385,555 2500,555 2535,520 2535,185 2425,75 1920,75 1785,210 1785,525 1810,550
NetC48_1 on Top Layer "NETC48_1_L01_P032" (solid, pour order 32): 2205,790 2345,790 2420,715 2675,715 2700,740 2700,820 2535,820 2520,805 2205,805
NetC50_1 on Top Layer "NETC50_1_L01_P035" (solid, pour order 35): 2195,765 2195,345 2210,330 2305,330 2325,350 2320,355 2320,730 2285,765
NetC50_2 on Top Layer "NETC50_2_L01_P034" (solid, pour order 34): 2094.83,780 2005,780 1965,740 1965,365 2000,330 2100,330
NetC49_1 on Top Layer "NETC49_1_L01_P033" (solid, pour order 33): 2100,790 1970,790 1850,670 1405,670 1385,690 1385,745 1405,760 1410,760 1565,760 1565,785 1685,785 1690,780 1930,780 1955,805 2100,805
GND on Top Layer "GND_L01_P031" (solid, pour order 31): 800,1180 670,1180 625,1135 625,860 630,860 695,795 1550,795 1550,925 1555,925 1815,925 1815,895 1910,895 1910,955 1915,960 2115,960 2115,750 2185,750 2185,1025 2545,1025 2545,900 2570,875 2675,875 2700,900 2700,965 2695,965 2490,1170 1265,1170 1265,975 1205,915 870,915 800,985
NetC43_1 on Top Layer "NETC43_1_L01_P030" (solid, pour order 30): 1095,1395 1170,1395 1220,1345 1220,990 1185,955 1095,955
NetC43_2 on Top Layer "NETC43_2_L01_P029" (solid, pour order 29): 985,1395 900,1395 840,1335 840,1010 895,955 990,955
GND on Top Layer "GND_L01_P028" (solid, pour order 28): 1005,1375 1005,1595 980,1620 775,1620 770,1615 770,1575 760,1565 670,1565 650,1585 650,1660 625,1685 365,1685 365,1590 345,1570 225,1570 200,1595 200,1870 250,1920 1515,1920 1595,1840 1595,1550 1565,1520 1435,1520 1420,1535 1420,1725 1080,1725 1075,1725 1075,1375
NetC41_1 on Top Layer "NETC41_1_L01_P027" (solid, pour order 27): 1095,1415 1405,1415 1430,1390 1565,1390 1590,1415 1590,1450 1420,1450 1400,1430 1098.75,1430
NetC42_1 on Top Layer "NETC42_1_L01_P026" (solid, pour order 26): 990,1415 700,1415 655,1370 230,1370 185,1415 185,1495 220,1530 500,1530 510,1520 510,1455 535,1430 986.25,1430
GND on Top Layer "GND_L01_P025" (solid, pour order 25): 670,3600 670,3955 750,4035 1060,4035 1125,3970 1125,3640 1235,3640 1265,3670 1265,3985 1207.5,3985 1052.5,4140 685,4140 555,4010 555,3600
NetC27_1 on Top Layer "NETC27_1_L01_P022" (solid, pour order 22): 860,3485 415,3485 385,3455 385,3350 395,3360 525,3360 525,3415 575,3465 860,3465
NetC29_2 on Top Layer "NETC29_2_L01_P024" (solid, pour order 24): 955,3505 1040,3505 1095,3560 1095,3925 1035,3985 960,3985 955,3975 955,3970
NetC29_1 on Top Layer "NETC29_1_L01_P023" (solid, pour order 23): 860,3505 775,3505 720,3560 720,3940 760,3980 855,3980 860,3965 860,3955
NetC28_1 on Top Layer "NETC28_1_L01_P021" (solid, pour order 21): 960,3485 1605,3485 1635,3455 1635,3410 1610,3385 1340,3385 1340,3440 1315,3465 960,3465
GND on Top Layer "GND_L01_P020" (solid, pour order 20): 875,3165 845,3135 525,3135 525,3295 515,3305 380,3305 380,3045 1575,3045 1655,3125 1655,3342.85 1647.85,3350 1465,3350 1465,3245 1230,3245 1230,3345 1160,3345 1160,3280 960,3280 945,3295 945,3525 875,3525
NetC34_1 on Top Layer "NETC34_1_L01_P018" (solid, pour order 18): 1570,4410 1080,4410 1055,4385 1055,4290 1070,4275 1200,4275 1210,4285 1210,4355 1250,4395 1570,4395
GND on Top Layer "GND_L01_P019" (solid, pour order 19): 1355,4855 1420,4920 1835,4920 1865,4890 1865,4605 1970,4605 2005,4640 2005,4935 1885,5055 1345,5055 1220,4930 1220,4580 1255,4545 1355,4545
NetC35_1 on Top Layer "NETC35_1_L01_P017" (solid, pour order 17): 1680,4415 1795,4415 1850,4470 2365,4470 2380,4455 2380,4395 2355,4370 2105,4370 2080,4395 1680,4395
NetC36_2 on Top Layer "NETC36_2_L01_P016" (solid, pour order 16): 1690,4425 1690.47,4424.53 1744.53,4424.53 1805,4485 1805,4850 1780,4875 1700,4875 1690,4865
NetC36_1 on Top Layer "NETC36_1_L01_P015" (solid, pour order 15): 1570,4425 1510,4425 1440,4495 1440,4855 1460,4875 1555,4875 1570,4860
GND on Top Layer "GND_L01_P014" (solid, pour order 14): 1590,4450 1590,4100 1560,4070 1250,4070 1200,4120 1200,4230 1060,4230 1060,4035 1125,3970 2300,3970 2395,4065 2395,4315 2365,4345 2235,4345 2235,4225 1980,4225 1980,4250 1660,4250 1660,4450
+15V on Top Layer "+15V_L01_P007" (solid, pour order 7): 1910,2570 1860,2570 1860,2600 1820,2600 1820,2590 1790,2560 1650,2560 1640,2550 1320,2550 1295,2525 1055,2525 1055,2645 1085,2675 1850,2675 1910,2615
NetR3_1 on Top Layer "NETR3_1_L01_P012" (solid, pour order 12): 1990,2525 1990,2300 2000,2290 2040,2290 2055,2305 2055,2425.83 2020,2525
NetC4_1 on Top Layer "NETC4_1_L01_P011" (solid, pour order 11): 2005,2530 2050,2530 2140,2450 2140,2425 2325,2425 2360,2460 2360,2505 2345,2520 2140,2520 2105,2550 2005,2550 2005,2542.32
GND on Top Layer "GND_L01_P009" (solid, pour order 9): 1972.81,2657.9 1969.91,2655 1910,2655 1870,2695 1870,2855 1925,2910 2185,2910 2350,2745 2350,2560 2330,2540 2155,2540 2155,2745 2105,2795 1985,2795 1975,2785
GND on Top Layer "GND_L01_P008" (solid, pour order 8): 395,2485 675,2485 995,2165 995,2025 955,1985 650,1985 575,2060 575,2240 515,2300 395,2300 370,2325 370,2460
NetR4_2 on Top Layer "NETR4_2_L01_P005" (solid, pour order 5): 1910,2525 1865,2525 1865,2490 1805,2430 1805,2360 1830,2335 1875,2335 1885,2345 1885,2440 1910,2465
GND on Layer 2 "GND_L03_P037" (solid, pour order 37): 400,2480 405,2485 630,2485 645,2470 645,2055 580,2055 575,2060 575,2245 515,2305 385,2305 370,2320 370,2455
GND on Bottom Layer "GND_L04_P038" (solid, pour order 38): 395,2485 675,2485 995,2165 995,2025 955,1985 650,1985 580,2055 575,2055 575,2240 515,2300 395,2300 370,2325 370,2460
GND on Layer 1 "GND_L02_P001" (solid, remove dead copper, pour order 1): 50,85 ccw(c90,85) 90,45 7030,45 ccw(c7030,80) 7065,80 7065,5045 ccw(c7025,5045) 7025,5085 110,5085 ccw(c110,5025) 50,5025

## Keep-outs
Keep-Out Layer:
  circle w10: c377.13,2199.92 r61.98
  circle w10: c377.13,2799.92 r69.26
  circle w10: c6853.5,4901.5 r116.68
  circle w10: c6814.13,236.14 r116.4
  circle w10: c239.33,4881.81 r116.88
  circle w10: c259.02,236.14 r112.88

## Silkscreen, mask and mechanical layers (free items; w line width, h text height)
Top Overlay:
  drawing of 63 lines, arcs and shapes, not listed
  text "V1" at 4190,4525 h60
  text "V2" at 6415,3505 h60
  text "V4" at 6395,2105 h60
  text "V3" at 4930,365 h60
  text "MOSFET Circuit" at 465,140 h100
Bottom Overlay:
  text "Designed By: Mohammed Tuhin Rana" at 5880,116.27 h60
Mechanical 1:
  lines w10: 5,55 ccw(c55,55) 55,5 7065,5 ccw(c7065,55) 7115,55 7115,5090 ccw(c7065,5090) 7065,5140 55,5140 ccw(c55,5090) 5,5090 5,2470 5,55